# Altium PCB GR_Propulsion.PcbDoc
Units mm, origin at the board's own origin, x right, y up, seen from the top; angles counter-clockwise.
Board outline 70 x 54 mm, 2 copper layers (Top Layer, Bottom Layer), stack 1.586 mm thick; 32 components, 26 nets, 103 pads, 18 vias.
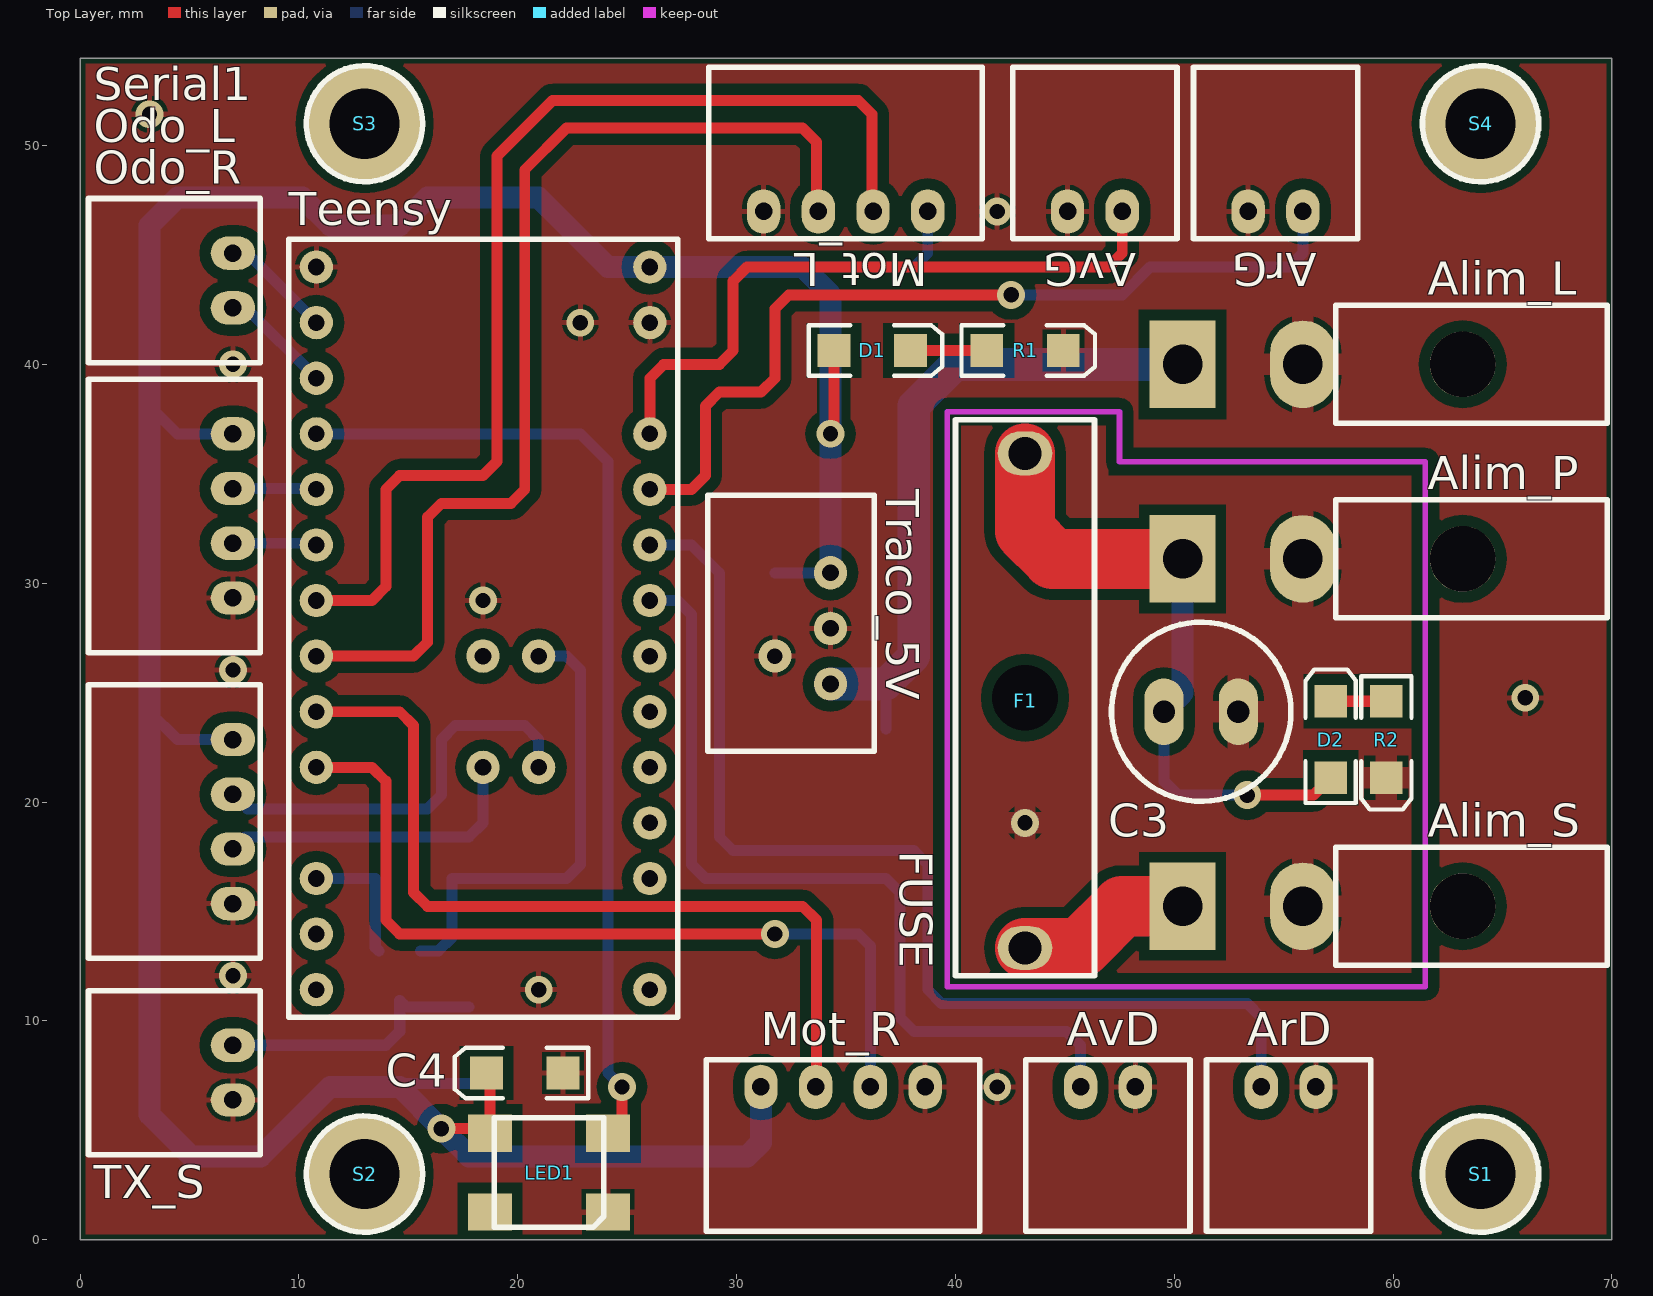
[diagram p0: Top Layer view]
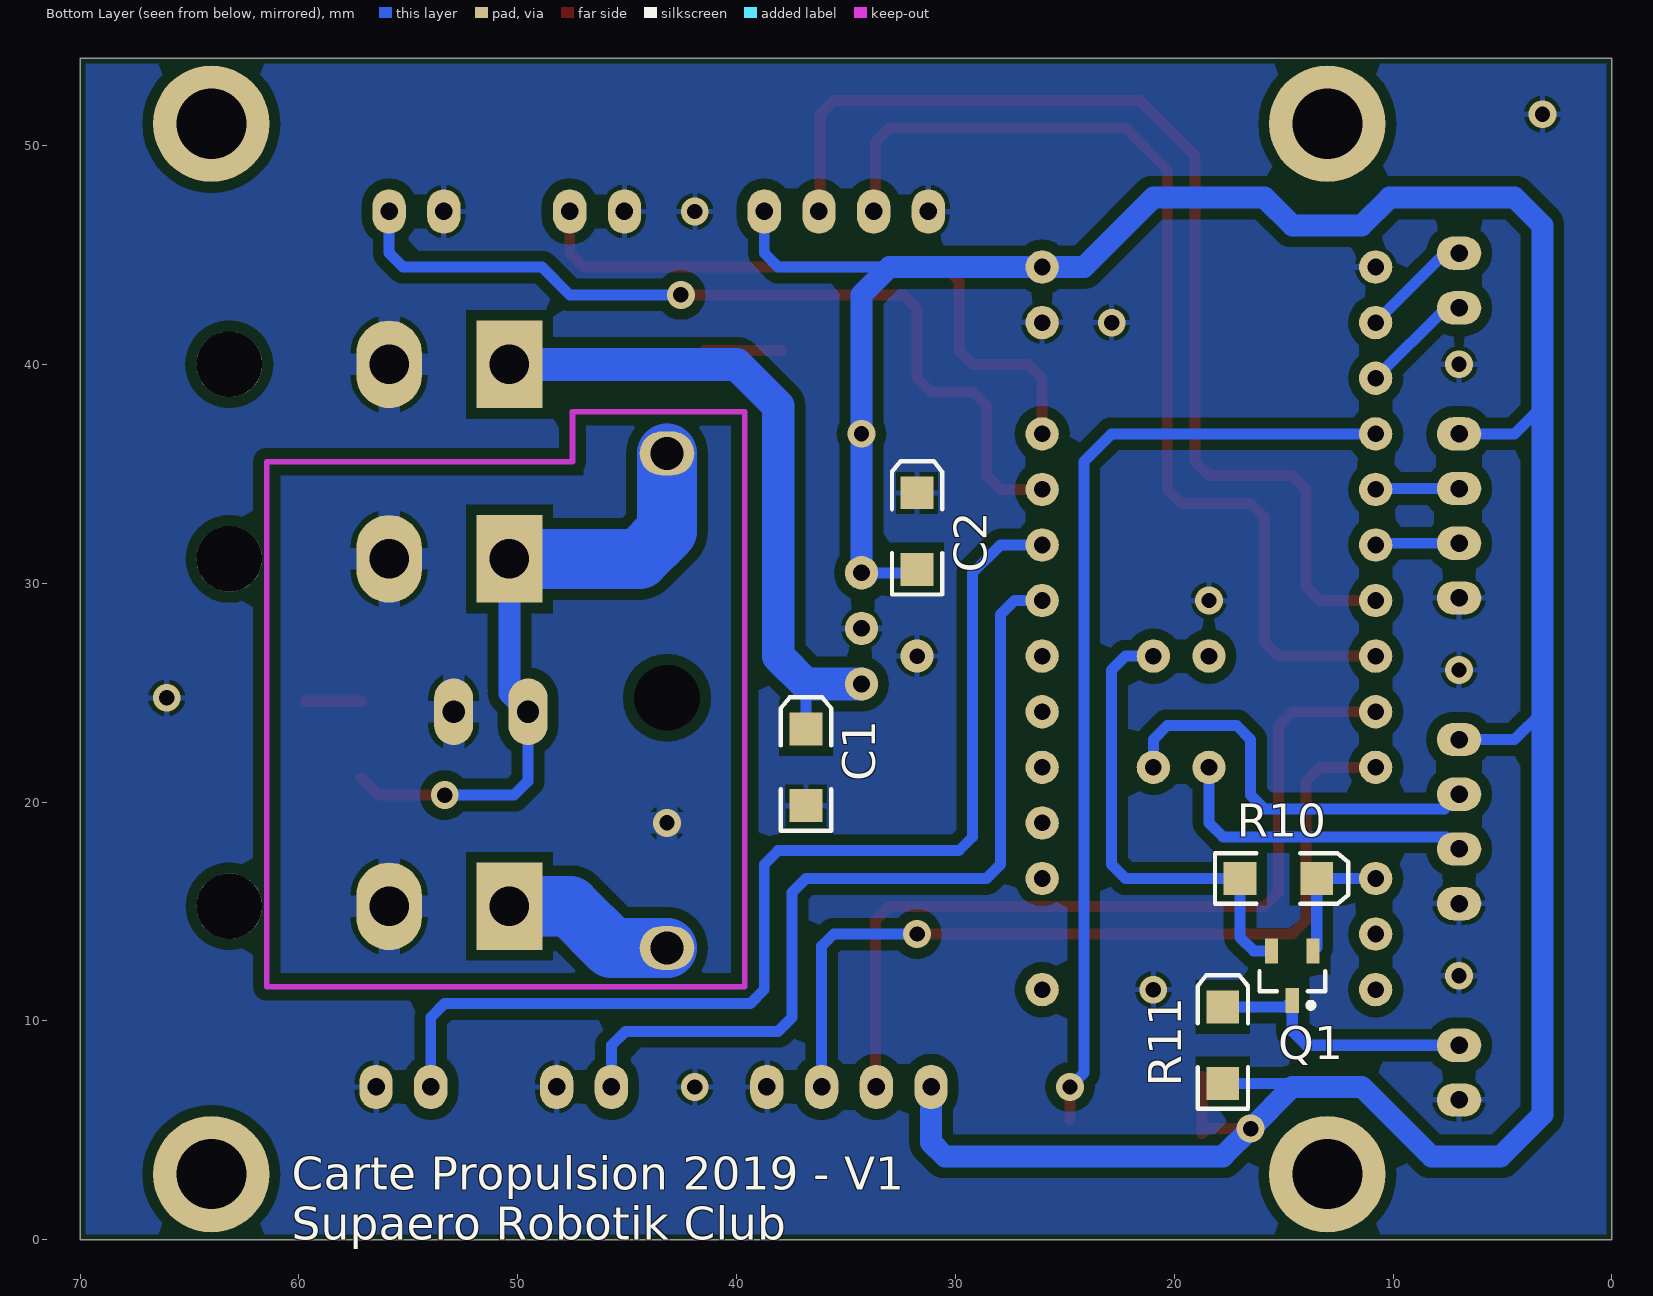
[diagram p1: Bottom Layer view, seen from below]

## Layer stack, top to bottom
Top Solder: solder mask 0.0102, Solder Resist, Dk 3.5
Top Layer: signal copper 0.018
Dielectric1: core 1.55, FR-4, Dk 4.8
Bottom Layer: signal copper 0.018
Bottom Solder: solder mask 0.0102, Solder Resist, Dk 3.5

## Board outline
0,0 0,54 70,54 70,0

## Design rules (kind name [scope] priority, off if disabled: settings)
BoardOutlineClearance [All] p1: gap=0.25 except(0: Arc-SplitContinuation Track-SplitContinuation SMDPad-SplitContinuation THPad-SplitContinuation Via-SplitContinuation Fill-SplitContinuation Poly-SplitContinuation Region-SplitContinuation Text-SplitContinuation)
Clearance Clearance-xPP-xTP-xTT [All] p1: gap=0.254 except(0.5: Arc-Poly Track-Poly SMDPad-Poly THPad-Poly Via-Poly Fill-Poly Poly-Region Poly-Text; 1: Poly-Poly)
ComponentClearance [InComponent('D2') vs InComponent('R2')] p1: gap=0 collisioncheckmode=3 verticalgap=0 showdistances=FALSE
ComponentClearance ComponentClearance_2 [All] p2: gap=0.254 collisioncheckmode=3 verticalgap=0.254 showdistances=FALSE
ComponentClearance ComponentClearance_1 [InComponent('Logo')] p3: gap=0 collisioncheckmode=3 verticalgap=0 showdistances=FALSE
DiffPairsRouting [All] p1: maxlimit=0.25 minlimit=0.25 mostfreqgap=0.25 toplayer_minwidth=0.381 toplayer_maxwidth=0.381 toplayer_prefwidth=0.381 bottomlayer_minwidth=0.381 bottomlayer_maxwidth=0.381 bottomlayer_prefwidth=0.381 maxuncoupledlength=12.5
Height [All] p1: minheight=0 maxheight=25 prefheight=12.5
HoleSize HoleSize-PTH [All] p1: absolutevalues=TRUE maxlimit=2 minlimit=0.25 maxpercent=80.000 minpercent=20.000
HoleToHoleClearance [All] p1: gap=0.35 allowstackedmicrovias=TRUE
MinimumAnnularRing "Minimum IAR  >0.45mm" [((ObjectKind = 'Pad') OR (ObjectKind = 'Via')) And (Layer = 'MultiLayer') And (HoleDiameter > AsMM(0.45))] p1: minimumring=0.175 // minimum inner annular ring for pads > 0.45mm finished hole size
MinimumAnnularRing "Minimum IAR <=0.45mm" [((ObjectKind = 'Pad') OR (ObjectKind = 'Via')) And (Layer = 'MultiLayer') And (HoleDiameter <= AsMM(0.45))] p2: minimumring=0.175 // minimum inner annular ring for pads <= 0.45mm finished hole size
MinimumSolderMaskSliver [All] p1: minsoldermaskwidth=0.08
PlaneClearance PlaneClearance-IPI [All] p1: clearance=0.25
PlaneConnect [All] p1: planeconnectstyle=Relief reliefexpansion=0.175 reliefentries=4 reliefconductorwidth=0.2 reliefairgap=0.2
PolygonConnect PolygonConnect_GNDL [InNet('GND') vs HasFootprint('MOLEX_MINIFITJR_2X1H')] p1: connectstyle=Relief reliefconductorwidth=1 reliefentries=4 polygonreliefangle="90 Angle" airgapwidth=0.254
PolygonConnect PolygonConnect_GNDA [InNet('GNDP')] p2: connectstyle=Relief reliefconductorwidth=1 reliefentries=4 polygonreliefangle="90 Angle" airgapwidth=0.254
PolygonConnect PolygonConnect-xTW [All] p3: connectstyle=Relief reliefconductorwidth=0.254 reliefentries=4 polygonreliefangle="90 Angle" airgapwidth=0.2
RoutingCorners [All] p1: cornerstyle=45-Degree minsetback=2.5 maxsetback=2.5
RoutingVias "RoutingVias > 0.45mm" [(ObjectKind = 'Via') And (HoleDiameter > AsMM(0.45))] p1: holewidth=0.5 width=0.85 viastyle="Through Hole" minholewidth=0.5 minwidth=0.85 maxholewidth=0.9 maxwidth=1.25 // finishet hole size > 0.45mm
RoutingVias "RoutingVias <= 0.45mm" [(ObjectKind = 'Via') And (HoleDiameter <= AsMM(0.45))] p2: holewidth=0.3 width=0.65 viastyle="Through Hole" minholewidth=0.25 minwidth=0.6 maxholewidth=0.45 maxwidth=0.8 // finishet hole size <= 0.45mm
SilkToSilkClearance [All] p1: silktosilkclearance=0.2
SilkToSolderMaskClearance SilkscreenOverComponentPads [IsPad] p1: minsilkscreentomaskgap=0.2 clearancetoexposedcopper=TRUE
SolderMaskExpansion [All] p1: expansion=0
Width Width-xTW [All] p1: maxlimit=3 minlimit=0.254 preferedwidth=0.508
19 further rules are at their usual default settings.

## Components (designator, comment, footprint, x,y, rotation, side; value= is the part's Value field where it differs from the comment)
Alim_L "Minifit Jr 2x1H" MOLEX_MINIFITJR_2X1H 55.88,40.005 r0 top
Alim_P "Minifit Jr 2x1H" MOLEX_MINIFITJR_2X1H 55.88,31.115 r0 top
Alim_S "Minifit Jr 2x1H" MOLEX_MINIFITJR_2X1H 55.88,15.24 r0 top
ArD "SPOX 2x1H" "MOLEX SPOX 2X1H" 53.975,6.985 r0 top
ArG "SPOX 2x1H" "MOLEX SPOX 2X1H" 55.88,46.99 r180 top
AvD "SPOX 2x1H" "MOLEX SPOX 2X1H" 45.72,6.985 r0 top
AvG "SPOX 2x1H" "MOLEX SPOX 2X1H" 47.625,46.99 r180 top
C1 "Cap22uF" 3.2X1.6X1.1 36.83,21.59 r90 bottom
C2 "Cap50uF" 3.2X1.6X1.1 31.75,32.385 r90 bottom
C3 "Cap50uF" CONDENSATEUR 49.53,24.13 r0 top
C4 "Cap" 3.2X1.6X1.1 20.32,7.62 r180 top
D1 "LED1" 3.2X1.6X1.1 36.195,40.64 r0 top
D2 "LED2" 3.2X1.6X1.1 57.15,22.86 r90 top
F1 "10A" FUSE 43.18,13.335 r90 top
LED1 "NeoPixel" NEOPIXEL 24.13,1.27 r180 top
Mot_L "SPOX 4x1H" "MOLEX SPOX 4X1H" 38.735,46.99 r180 top
Mot_R "SPOX 4x1H" "MOLEX SPOX 4X1H" 31.115,6.985 r0 top
Odo_L "SPOX 4x1H" "MOLEX SPOX 4X1H" 6.985,36.83 r270 top
Odo_R "SPOX 4x1H" "MOLEX SPOX 4X1H" 6.985,22.86 r270 top
Q1 "MOSFET-N" SOT23_N 14.605,12.065 r270 bottom
R1 "Res2" 3.2X1.6X1.1 43.18,40.64 r0 top
R2 "Res2" 3.2X1.6X1.1 59.69,22.86 r270 top
R10 "Res2" 3.2X1.6X1.1 15.24,16.51 r180 bottom
R11 "Res2" 3.2X1.6X1.1 17.78,8.89 r90 bottom
S1 "Screw M3" "SCREW M3" 64,3 r0 top
S2 "Screw M3" "SCREW M3" 13,3 r0 top
S3 "Screw M3" "SCREW M3" 13,51 r0 top
S4 "Screw M3" "SCREW M3" 64,51 r0 top
Serial1 "SPOX 2x1H" "Molex SPOX 2x1H" 6.985,45.085 r270 top
Teensy "Teensy 3.2" teensy 8.255,24.13 r0 top
Traco_5V "Traco TRS2-2450" TRS 34.29,25.4 r270 top
TX_S "SPOX 2x1H" "MOLEX SPOX 2X1H" 6.985,8.89 r270 top

## Footprints (in the part's own frame and the unit in brackets; to place one, negate y for a bottom-side part, rotate by r counter-clockwise, add the part's x,y. Pads: shape width x height; smd on the part's side, far side on the other; paste and mask are expansions set on the pad)
3.2X1.6X1.1 [mm] "SMT LED; 2 Flat Leads"
  rect 1.5x1.5 smd: 1(-1.75,0) 2(1.75,0)
  silkscreen extent -2.9,-1.15 3.2,1.15
CONDENSATEUR [mil]
  oval 70x120 hole 40: 1(0,0) 2(133.86,0)
  silkscreen extent -94,-161 228,161, body extent -93,-160 227,160, height 500
FUSE [mm] "Porte-fusible monté sur circuit 10 (UL) A, 6.3 (VDE) A, fusible Cartouche, 893-0574"
  round 2 hole 3: 0(11.43,0)
  oval 2x2.5 hole 1.5: 1(0,0) 2(22.6,0)
  silkscreen extent -1.27,-3.17 24.13,3.18, body extent -1.27,-4.29 24.13,4.29, height 11.41
"MOLEX SPOX 2X1H" [mil] "Prise CI, Molex, 3 Contacts, 1 rangée, entraxe 2.5mm, 3A, Coudé, ref 22-03-5035"
  oval 60x80 hole 31.5: 1(0,0) 2(98.43,0)
  silkscreen extent -98,-260 197,49, body extent -98,-262 193,49, height 193
"Molex SPOX 2x1H" [mil] "Prise CI, Molex, 3 Contacts, 1 rangée, entraxe 2.5mm, 3A, Coudé, ref 22-03-5035"
  oval 60x80 hole 31.5: 1(0,0) 2(98.43,0)
  silkscreen extent -98,-260 197,49, body extent -98,-262 193,49, height 193
"MOLEX SPOX 4X1H" [mil] "Prise CI, Molex, 3 Contacts, 1 rangée, entraxe 2.5mm, 3A, Coudé, ref 22-03-5035"
  oval 60x80 hole 31.5: 1(0,0) 2(98.43,0) 3(196.85,0) 4(295.28,0)
  silkscreen extent -98,-260 394,49, body extent -98,-262 390,49, height 193
MOLEX_MINIFITJR_2X1H [mm] "Connecteur Molex 2"
  rect 3x4 hole 1.8: 1(-5.5,0)
  oval 3x4 hole 1.8: 2(0,0)
  round 3 hole 3 unplated: 3(7.3,0)
  silkscreen extent 1.5,-2.7 13.9,2.7, body extent -6.03,-2.7 13.9,3.1, height 11.01
NEOPIXEL [mm]
  rect 2x1.7 smd: 1(0,0) 2(0,-3.6) 3(5.4,-3.6) 4(5.4,0)
  silkscreen extent 0.2,-4.3 5.2,0.7, body extent 0.19,-4.33 5.19,0.67, height 2
"SCREW M3" [mm] "M3 iso Screw"
  round 5.32 hole 3.2 unplated: 0(0,0)
  silkscreen extent -2.66,-2.66 2.66,2.66
SOT23_N [mm] "SOT23, 3-Leads, Body 2.9x1.3mm, Pitch 0.95mm, Lead Span 2.3mm - Reverse Pinning, IPC Medium Density"
  rect 1.15x0.6 smd: 1(1.125,0) 2(-1.125,-0.95) 3(-1.125,0.95)
  silkscreen extent -0.2,-1.5 1.47,1.5, body extent -0.7,-1.5 0.7,1.5, height 1.1
teensy [mil] "Teensy 3.2"
  round 60 hole 30: 0(100,700) 1(100,600) 2(100,500) 3(100,400) 4(100,300) 5(100,200) 6(100,100) 7(100,0) 8(100,-100) 10(100,-300) 11(100,-400) 12(100,-500) 13(700,-500) 15(700,-300) 16(700,-200) 17(700,-100) 18(700,0) 19(700,100) 20(700,200) 21(700,300) 22(700,400) 23(700,500) 25(400,-100) 32(500,-100) 39(500,100) 40(400,100) 42(700,700) 43(700,800) 44(100,800)
  silkscreen extent 50,-550 750,850, body extent 48,-550 752,907, height 505
TRS [mil]
  round 60 hole 30: 1(0,0) 2(-100,0) 3(-200,0)
  silkscreen extent -340,-220 121,79, body extent -341,-218 120,78, height 398

## Part data
Alim_L Alim_P Alim_S: library part "Header 2", "Molex Minifit Jr 2x1H"
ArD ArG AvD AvG Serial1 TX_S: library part "Header 2", "Molex SPOX Jr 2x1H"
C1 C2 C3: library part Cap, "Capacitor"
C4: "Capacitor"
D1: library part LED2, "Typical RED, GREEN, YELLOW, AMBER GaAs LED"
D2: "Typical RED, GREEN, YELLOW, AMBER GaAs LED"
F1: library part "Fuse 1", "Fuse"
Mot_L Mot_R Odo_L Odo_R: library part "Header 4H", "Molex SPOX 4x1H"
Q1: "N-Channel MOSFET"
R1 R2 R10 R11: "Resistor"
Teensy: library part teensy3.2
Traco_5V: library part "Volt Reg", "Voltage Regulator"

## Via types
v1: diameter 1.27, hole 0.7, Top Layer to Bottom Layer, 17 vias
v2: diameter 1.5, hole 0.7, Top Layer to Bottom Layer, 1 vias

## Nets (pads, with @x,y where several pads share a name; then routed paths per layer and width w, separated by ;. In a path a pad name is that pad's centre, name@x,y a point inside that pad or via, vN(x,y) a via of type N, cw(c..) or ccw(c..) an arc to the next point about the centre after c; other vN are vias at no path point)
3V3_L: Q1.2 R10.1 Teensy.39 | length 21.6
  Bottom Layer w0.508: Q1.2 16.365,13.19 16.99,13.815 R10.1 22.225,16.51 22.86,17.145 22.86,26.035 22.225,26.67 Teensy.39
5VL: C2.1 C4.2 D1.1 LED1.3 Mot_L.1 Mot_R.1 Odo_L.1 Odo_R.1 R11.1 Teensy.43 Traco_5V.3 | length 161.8
  Top Layer w0.5: LED1.3 C4.2@18.73,7.46
  Top Layer w0.508: v1(16.51,5.08) 18.52,5.08 LED1.3 ; v1@34.445,36.985 D1.1
  Bottom Layer w0.5: 3.175,24.13 4.445,22.86 Odo_R.1 ; 3.175,40.005 3.175,38.1 4.445,36.83 Odo_L.1 ; Teensy.43 38.1,44.45 38.735,45.085 Mot_L.1 ; C2.1@31.75,30.48 Traco_5V.3
  Bottom Layer w0.508: 14.605,6.985 14.76,7.14 R11.1
  Bottom Layer w1: Mot_R.1 31.115,4.445 30.48,3.81 17.78,3.81 v1(16.51,5.08) 14.605,6.985 11.43,6.985 8.255,3.81 5.08,3.81 3.175,5.715 3.175,46.355 4.445,47.625 10.16,47.625 11.43,46.355 14.605,46.355 15.875,47.625 20.955,47.625 24.13,44.45 Teensy.43 33.02,44.45 34.29,43.18 v1(34.29,36.83) Traco_5V.3
24VL: Alim_L.1 C1.2 Traco_5V.1 | length 30.9
  Bottom Layer w0.5: C1.2 36.83,25.4
  Bottom Layer w1.5: Traco_5V.1 36.83,25.4 38.1,26.67 38.1,38.1 40.005,40.005 Alim_L.1
24VP: Alim_P.1 C3.1 D2.1 F1.2 | length 41.3
  Top Layer w0.508: v1(53.34,20.32) 56.36,20.32 D2.1
  Top Layer w2.75: F1.2 43.18,32.385 44.45,31.115 Alim_P.1
  Bottom Layer w0.508: C3.1 49.53,20.955 50.165,20.32 v1(53.34,20.32) ; C3.1@50.38,24.98 50.38,25.19
  Bottom Layer w1: C3.1 C3.1@50.38,24.98 ; 50.38,25.19 Alim_P.1
  Bottom Layer w2.75: F1.2 43.18,32.385 44.45,31.115 Alim_P.1
24VS: Alim_S.1 F1.1 | length 16
  Top Layer w2.75: F1.1 45.72,13.335 47.625,15.24 Alim_S.1
  Bottom Layer w2.75: F1.1 45.72,13.335 47.625,15.24 Alim_S.1
BUMP_ARD: ArD.1 Teensy.21 | length 50.5
  Bottom Layer w0.5: Teensy.21 27.94,31.75 29.21,30.48 29.21,18.415 29.845,17.78 38.1,17.78 38.735,17.145 38.735,11.43 39.37,10.795 53.34,10.795 53.975,10.16 ArD.1
BUMP_ARG: ArG.1 Teensy.22 | length 39.9
  Top Layer w0.5: Teensy.22 27.94,34.29 28.575,34.925 28.575,35.56 28.575,38.1 29.21,38.735 31.115,38.735 31.75,39.37 31.75,42.545 32.385,43.18 v1(42.545,43.18)
  Bottom Layer w0.5: v1(42.545,43.18) 47.625,43.18 48.895,44.45 55.245,44.45 55.88,45.085 ArG.1
BUMP_AVD: AvD.1 Teensy.20 | length 40.1
  Bottom Layer w0.5: Teensy.20 27.305,29.21 27.94,28.575 27.94,17.145 28.575,16.51 36.83,16.51 37.465,15.875 37.465,10.16 38.1,9.525 45.085,9.525 45.72,8.89 AvD.1
BUMP_AVG: AvG.1 Teensy.23 | length 30.3
  Top Layer w0.5: Teensy.23 26.035,39.37 26.67,40.005 29.21,40.005 29.845,40.64 29.845,41.91 29.845,43.815 30.48,44.45 40.64,44.45 46.99,44.45 47.625,45.085 AvG.1
GND: Alim_L.2 ArD.2 ArG.2 AvD.2 AvG.2 C1.1 C2.2 C4.1 LED1.1 Mot_L.4 Mot_R.4 Odo_L.4 Odo_R.4 R1.2 Teensy.42 Teensy.44 Traco_5V.2 TX_S.2
  other v1: 41.91,6.985 20.955,11.43 6.985,12.065 66.04,24.765 6.985,26.035 18.415,29.21 6.985,40.005 22.86,41.91 41.91,46.99 3.175,51.435
  other v2: 31.75,26.67
GNDP: Alim_P.2 Alim_S.2 C3.2 R2.2
  other v1: 43.18,19.05
MOT_L_A: Mot_L.2 Teensy.5 | length 50.4
  Top Layer w0.5: Teensy.5 13.335,29.21 13.97,29.845 13.97,34.29 14.605,34.925 18.415,34.925 19.05,35.56 19.05,49.53 21.59,52.07 35.56,52.07 36.195,51.435 Mot_L.2@36.195,46.99
  Bottom Layer w0.5: Mot_L.2@36.195,47.03 Mot_L.2
MOT_L_B: Mot_L.3 Teensy.6 | length 48.2
  Top Layer w0.5: Teensy.6 15.24,26.67 15.875,27.305 15.875,33.02 16.51,33.655 19.685,33.655 20.32,34.29 20.32,48.895 22.225,50.8 33.02,50.8 33.655,50.165 Mot_L.3@33.655,46.99
MOT_R_A: Mot_R.2 Teensy.7 | length 38.9
  Top Layer w0.5: Teensy.7 14.605,24.13 15.24,23.495 15.24,15.875 15.875,15.24 33.02,15.24 33.655,14.605 Mot_R.2@33.655,6.985
  Bottom Layer w0.5: Mot_R.2 Mot_R.2@33.655,7.025
MOT_R_B: Mot_R.3 Teensy.8 | length 38.9
  Top Layer w0.5: Teensy.8 13.335,21.59 13.97,20.955 13.97,14.605 14.605,13.97 v1(31.75,13.97)
  Bottom Layer w0.5: v1(31.75,13.97) 35.56,13.97 36.115,13.415 Mot_R.3
NEOPIXEL: LED1.2 Teensy.2 | length 44.1
  Top Layer w0.5: LED1.2@24.765,5.505 v1(24.765,6.985)
  Bottom Layer w0.5: Teensy.2@11.04,37.2 11.41,36.83 22.86,36.83 24.13,35.56 24.13,7.62 v1(24.765,6.985)
NetD1_2: D1.2 R1.1 | length 3.5
  Top Layer w0.508: D1.2 R1.1
NetD2_2: D2.2 R2.1 | length 2.5
  Top Layer w0.508: D2.2 R2.1
ODO_L_A: Odo_L.2 Teensy.3 | length 3.8
  Bottom Layer w0.5: Odo_L.2 Teensy.3@10.755,34.33
ODO_L_B: Odo_L.3 Teensy.4 | length 3.8
  Bottom Layer w0.5: Odo_L.3 10.715,31.83 Teensy.4
ODO_R_A: Odo_R.2 Teensy.32 | length 18.6
  Bottom Layer w0.5: Odo_R.2 7.66,19.685 15.875,19.685 16.51,20.32 16.51,22.86 17.145,23.495 20.32,23.495 20.955,22.86 20.955,22.205 Teensy.32@21.2,21.96
ODO_R_B: Odo_R.3 Teensy.25 | length 14.6
  Bottom Layer w0.5: Odo_R.3 7.54,18.415 17.78,18.415 18.415,19.05 18.415,21.345 Teensy.25@18.66,21.59
S1_RX: Serial1.1 Teensy.0 | length 5.1
  Bottom Layer w0.508: Serial1.1 7.62,45.085 Teensy.0
S1_TX: Serial1.2 Teensy.1 | length 5.1
  Bottom Layer w0.508: Serial1.2 7.58,42.585 Teensy.1
TX_SABER: Q1.3 R10.2 Teensy.10 | length 6.1
  Bottom Layer w0.508: Teensy.10 R10.2 13.49,13.355 Q1.3
TX_SABER_5V: Q1.1 R11.2 TX_S.1 | length 12.6
  Bottom Layer w0.508: TX_S.1 13.97,8.89 14.605,9.525 Q1.1 14.905,10.64 R11.2
pads on no net: Alim_L.3 Alim_P.3 Alim_S.3 F1.0 LED1.4 S1.0 S2.0 S3.0 S4.0 Teensy.11 Teensy.12 Teensy.13 Teensy.15 Teensy.16 Teensy.17 Teensy.18 Teensy.19 Teensy.40

## Polygon pours and split planes (outlines as drawn)
GND on Top Layer "op GNDL" (solid, remove dead copper, pour order 22): 0,54 70,54 70,0 0,0
GNDP on Top Layer "Top GNDP" (solid, remove dead copper, pour order 0): 60.96,34.925 46.99,34.925 46.99,37.465 40.005,37.465 40.005,12.065 53.975,12.065 60.96,12.065
GND on Bottom Layer "Bot GNDL" (solid, pour order 20): 0,54 70,54 70,0 0,0
GNDP on Bottom Layer "Bot GNDP" (solid, remove dead copper, pour order 4): 60.96,34.925 46.99,34.925 46.99,37.465 40.005,37.465 40.005,12.065 60.96,12.065

## Keep-outs
Keep-Out Layer:
  lines w0.254: 39.624,11.557 39.624,37.846 47.498,37.846 47.498,35.56 61.468,35.56 61.468,11.557 39.624,11.557

## Silkscreen, mask and mechanical layers (free items; w line width, h text height)
Bottom Overlay:
  text "Carte Propulsion 2019 - V1 / Supaero Robotik Club" at 60.325,0 h1.52
Mechanical 2:
  the board outline again, w0.254

## Dimensions
64,3 to 70,0 on Mechanical 3
64,3 to 70,0 on Mechanical 3
70,0 to 70,54 on Mechanical 3
0,0 to 70,0 on Mechanical 3

## Text inside footprints (layer, text, board x,y; h text height)
F1: Top Overlay "FUSE" at 37.465,17.78 h1.52 r270